# Altium PCB PCB_Smart-Watch-v1.0.PcbDoc (part 2 of 2)
Units mil, origin at the board's own origin, x right, y up, seen from the top; angles counter-clockwise.
Board outline 1007.4 x 787.4 mil, 4 copper layers (Top Layer, Layer 1, Layer 2, Bottom Layer), stack 62.449 mil thick; 64 components, 42 nets, 320 pads, 89 vias.
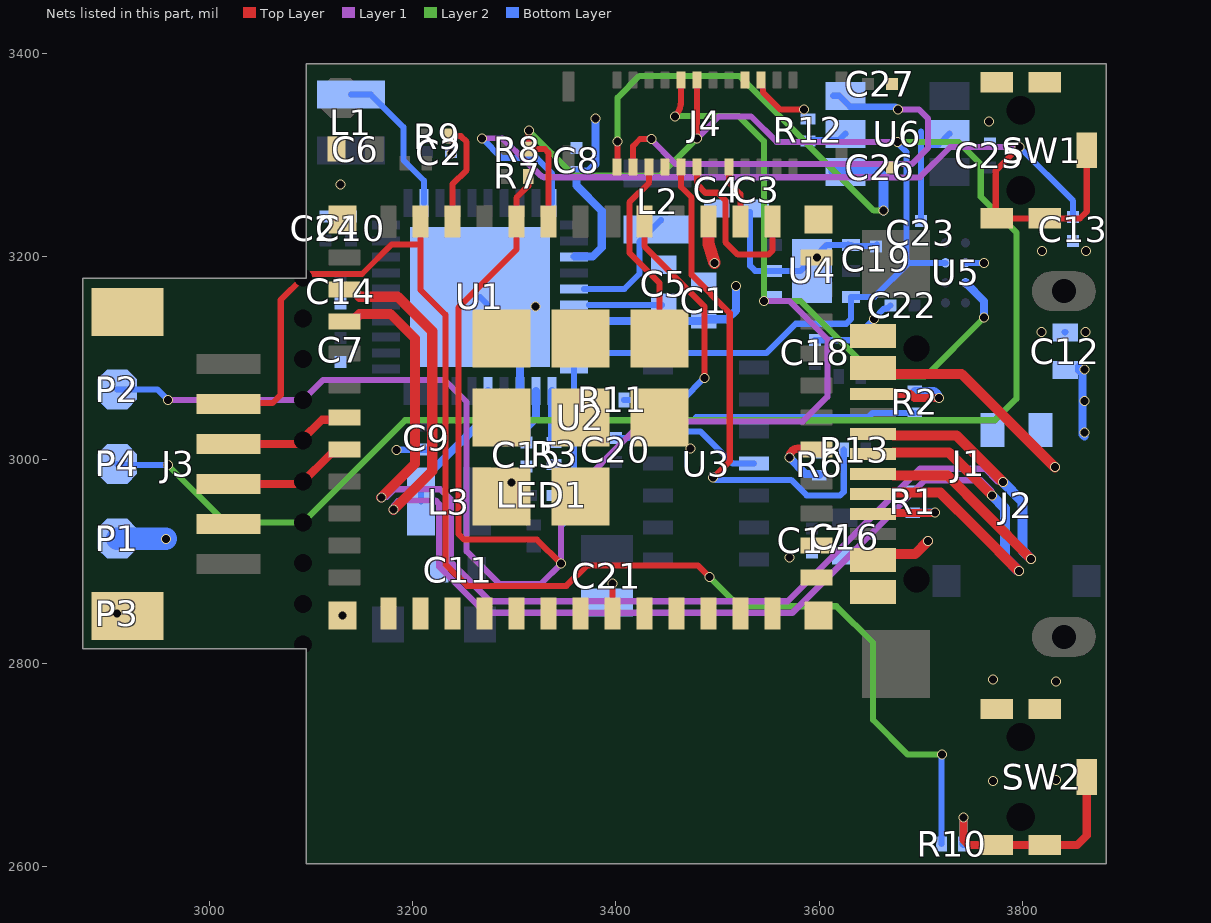
[diagram p4: the nets of this part, all layers, seen from the top]

## Via types
v1: diameter 9.84, hole 7.87, Top Layer to Bottom Layer, tented both sides, 89 vias

## Nets (pads, with @x,y where several pads share a name; then routed paths per layer and width w, separated by ;. In a path a pad name is that pad's centre, name@x,y a point inside that pad or via, vN(x,y) a via of type N, cw(c..) or ccw(c..) an arc to the next point about the centre after c; other vN are vias at no path point) (continued)
GND: C1.1 C2.2 C3.1 C4.1 C5.2 C6.1 C7.1 C8.1 C9.2 C10.1 C11.1 C12.2 C13.2 C14.1 C15.2 C16.1 C17.1 C18.1 C19.2 C20.1 C21.2 C22.2 C23.1 C24.1 C25.1 C26.1 C27.1 J1.A1 J1.A12 J1.B1 J1.B12 J2.2 J3.2 J3.MP1 J3.MP2 J4.3 J4.4 J4.15 J4.16 P3.1 pad.NC@3092,2818.11 R1.1 R2.1 R12.1 SW1.A SW1.G SW2.A SW2.G U1.3 U1.41 U2.1 U2.2 U2.11 U2.14 U2.36 U2.37 U2.38 U2.39 U2.40 U2.41 U2.42 U2.43 U2.44 U2.45 U2.46 U2.47 U2.48 U2.49 U2.50 U2.51 U2.52 U2.53 U3.4 U3.12 U4.2 U4.4 U4.7 U5.B1 U6.2 | length 1276.8
  Top Layer w6: U2.43@3396.47,2849 v1(3396.47,2878.47) ; J4.3@3432.51,3288.17 3432.51,3272.89 3413.09,3253.47 3413.09,3203.91 3419.47,3197.54 3442.74,3174.26 U2.49@3442.74,3119.67 ; J4.15@3542.75,3374 3544.28,3368.73 3544.5,3361.86 3561.38,3344.98 3585.1,3344.98 v1(3585.19,3344.89) ; U2.11@3597.26,3199.39 3597.61,3199.39 v1(3598,3199)
  Top Layer w12: U2.14@3490.96,3226.95 U2.14@3490.96,3234.83 3491,3222.08 3491,3213.92 ccw(c3497,3213.92) 3491.28,3212.12 v1(3497,3194)
  Bottom Layer w6: v1(3184,3010) 3212.81,3010 C9.2@3213,3010.19 ; U1.41@3266.12,3160.48 3305.49,3121.11 U1.41@3305.49,3137.11 ; v1(3297,2978) 3297,2978.38 C15.2@3312,2993.38 ; C20.1@3400,3021.62 3414.62,3021.62 3420.8,3027.8 U3.12@3441.46,3027.8 3483.2,3027.8 3514.7,2996.3 U3.4@3535.94,2996.3 ; 3479,3042 3648.22,3042 3652.57,3046.35 R2.1@3694,3046.35 ; C3.1@3532,3244 3532,3191 3537,3186 3581.69,3186 U4.7@3593,3197.31 ; C18.1@3596,3117.81 3632.94,3117.81 v1(3653.73,3138.6) 3664.23,3149.09 3667.09,3149.09 C22.2@3670,3152 ; U4.7@3596.34,3200.66 3607.28,3211.59 3628.17,3211.59 U4.4@3628.57,3212 ; U4.4@3631.39,3211.59 3632.28,3210.7 3655.7,3210.7 C19.2@3657,3212 ; C23.1@3700.01,3235.31 3700.01,3264.85 3700,3323 ; 3708.08,3310.22 3717.4,3310.22 U6.2@3728.18,3321 ; U5.B1@3744,3194 v1(3762,3194) ; C12.2@3841.5,3126 C12.2@3842,3125.5 C12.2@3842.5,3126
  Bottom Layer w8: U1.3@3305.49,3067.96 U1.41@3305.49,3121.11
  other v1: 3771,2684 3833,2685 3833,2782 3771,2784 3130.72,2847.03 2909,2849 3571,2904 3473.13,3011.42 3819,3126 3862,3126 3321,3151 3819.45,3205.75 3862.45,3205.75 3129,3271 3238,3301.55 3767,3333
HEART_RATE_INT: R11.1 U2.16 U3.13 | length 266.7
  Top Layer w6: U2.16@3427.97,3234.83 3427.97,3210.08 3487,3151.05 v1(3487,3080.79)
  Bottom Layer w6: R11.1@3407.83,3059 3407.97,3059.15 3441.31,3059.15 U3.13@3441.46,3059.29 3465.5,3059.29 v1(3487,3080.79)
I2C.SCL: J4.20 P2.1 pad.3 R7.1 U1.40 U2.20 U4.1 U5.C1 | length 2424.1
  Top Layer w6: R7.1@3313.65,3279 3313.65,3269.65 3301.98,3257.98 U2.20@3301.98,3234.83 3301.98,3206.98 3245.12,3150.12 3245.12,2926.88 3250.38,2921.62 3322.19,2921.62 v1(3346,2897.81) ; v1(3457.83,3338.07) ccw(c3442.93,3352.98) 3464.01,3352.98 J4.20@3464.01,3374 J4.20@3463.74,3373.73
  Layer 1 w6: v1(2959,3059.05) pad.3@3092,3059.05 3111.76,3078.81 3231.19,3078.81 3253,3057 3253,2910 3285,2878 3326.19,2878 v1(3346,2897.81) 3346,2957 3427,3038 3584,3038 3608,3062 3608,3119 3570.55,3156.45 v1(3545.5,3156.45)
  Layer 2 w6: v1@3457.14,3338.38 3520.85,3338.38 3545.5,3313.73 v1(3545.5,3156.45) 3581.55,3156.45 3656,3082 3704.18,3082 v1(3762.19,3140.01)
  Bottom Layer w6: P2.1@2909,3069.5 2948.55,3069.5 v1(2959,3059.05) ; v1(3346,2897.81) 3346,2935 3358.64,2947.64 U1.40@3358.64,3089.61
  Bottom Layer w8: U5.C1@3744.15,3173.97 3744.34,3173.97 3762.19,3156.13 v1(3762.19,3140.01)
I2C.SDA: J4.19 P4.1 pad.NC@3092,2938.58 R8.1 U1.39 U2.19 U4.6 U5.B2 | length 2413.5
  Top Layer w6: v1(3314.13,3324.19) 3313.89,3323.95 3313.89,3306.24 R8.1@3313.65,3306 3329.97,3306 3333.48,3302.49 U2.19@3333.48,3234.83 ; v1@3479.76,3317.68 J4.19@3479.76,3374
  Layer 1 w6: v1(3479.87,3316.57) 3501.3,3338 3533,3338 3558,3313 v1(3677,3313)
  Layer 2 w6: v1(2959,2995) 3015.42,2938.58 pad.NC@3092,2938.58 3192.42,3039 3773,3039 3794,3060 3794,3224 3759,3259 3759,3291 3737,3313 v1(3677,3313) ; v1(3314.13,3324.19) 3358.32,3280 3443.3,3280 v1(3479.87,3316.57)
  Bottom Layer w6: P4.1@2909,2996 2910,2995 v1(2959,2995) ; U1.39@3358.64,3105.36 3548.26,3105.36 3576.9,3134 3626.62,3134 3631.39,3138.77 U4.6@3631.39,3160.41 3654.41,3160.41 3688,3194 ; v1(3677,3313) 3677,3311.96 3686,3302.96 3686,3196 3688,3194 ; U5.B2@3724.32,3194 3688,3194
IO9: J3.5 pad.NC@3092,3179.53 R10.1 U2.23 | length 1383
  Top Layer w6: J3.5@3007,3056 3062,3056 3070,3064 3070,3157.53 pad.NC@3092,3179.53 3095.47,3183 3150,3183 3179.08,3212.08 3186.77,3212.08 ; 3187.19,3212.08 3207.5,3212.08 ; U2.23@3207.5,3234.83 3207.5,3212.5 3207.5,3167.5 3232.12,3142.88 3232.12,2897.33 3253.44,2876 3351,2876 3371,2896 3480.81,2896 v1(3492,2884.81)
  Layer 2 w6: v1(3492,2884.81) 3520.81,2856 3617,2856 3653,2820 3653,2744 3687,2710 v1(3721,2710)
  Bottom Layer w6: R10.1@3720.35,2622 3720.35,2709.35 v1(3721,2710)
LEDK-1: J4.1 U6.4 | length 478.6
  Top Layer w6: J4.1@3401.02,3288.17 3401.51,3288.67 v1(3401.51,3313.51)
  Layer 2 w6: v1(3401.51,3313.51) 3401.51,3356.51 3423,3378 3521.23,3378 3653.87,3245.36 v1(3663.39,3245.36)
  Bottom Layer w10: U6.4@3614.22,3284 3657.54,3284 3663.39,3278.14 v1(3663.39,3245.36)
LEDK-2: J4.2 U6.6 | length 464.5
  Top Layer w6: J4.2@3416.76,3288.17 3416.76,3308.98 3423.63,3315.84 v1(3435.16,3315.84)
  Layer 1 w6: v1@3433.16,3316.84 3458.83,3291.17 3691.17,3291.17 3706.94,3306.94 3706.94,3336.06 3698,3345 v1(3677.68,3345)
  Bottom Layer w6: U6.6@3613.82,3358.4 3619.72,3358.4 3630.5,3347.62 3675.06,3347.62 v1(3677.68,3345)
NetC5_1: C5.1 U1.36 | length 71.4
  Bottom Layer w6: 3373.64,3152.61 C5.1@3445,3152.61
NetC13_1: C13.1 SW1.B U1.30 | length 988.7
  Top Layer w6: v1(3797,3308) 3773.79,3284.79 3773.79,3238.67 SW1.B@3774.76,3237.7 SW1.B@3822,3237.7 3856.7,3237.7 3863.34,3244.34 SW1.B@3863.34,3304.63
  Layer 1 w6: v1(3268.14,3316.42) 3287.62,3316.78 3291.95,3312.62 3325.96,3279.85 ccw(c3330.12,3284.17) 3330.12,3278.17 3667.98,3278.17 3668.15,3278 3699,3278 3729,3308 v1@3795,3308
  Bottom Layer w6: v1(3268.14,3316.42) 3287.56,3297 3322,3297 3336.98,3282.02 U1.30@3336.98,3253 ; v1(3797,3308) 3850,3255 C13.1@3850,3240
NetC15_1: C15.1 U1.2 | length 54.8
  Bottom Layer w8: C15.1@3312,3017 3312,3032 3321.24,3041.24 U1.2@3321.24,3067.96
NetJ1_A5: J1.A5 R1.2 | length 75.1
  Top Layer w8: J1.A5@3653.2,2946.79 3654.06,2947.65 3713.55,2947.65 v1(3713.9,2948)
  Bottom Layer w8: 3700,2948 v1(3713.9,2948)
NetJ1_B5: J1.B5 R2.2 | length 96
  Top Layer w8: J1.B5@3653.2,3064.9 3689.93,3064.9 3693.93,3060.9 3717.62,3060.9 v1(3717.74,3060.77)
  Bottom Layer w8: R2.2@3695.32,3066.68 R2.2@3694,3068 3710.51,3068 cw(c3710.51,3060.77) v1(3717.74,3060.77)
NetL1_1: L1.1 U1.22 | length 147.9
  Bottom Layer w6: L1.1@3139,3359.56 3158.68,3359.56 3169.46,3348.78 3190.81,3327.43 3190.81,3295.19 3211,3275 U1.22@3211,3253
NetL2_2: L2.2 U1.35 | length 122.1
  Bottom Layer w6: U1.35@3368.64,3168.35 3408.35,3168.35 3423,3183 3423,3214.68 L2.2@3444.22,3235.91
NetL3_1: L3.1 U1.5 | length 136.6
  Bottom Layer w6: L3.1@3207.88,2959 3207.88,2978.68 3218.66,2989.46 L3.1@3219.13,2989.46
  Bottom Layer w8: L3.1@3219.13,2989.46 3273.99,3044.33 U1.5@3273.99,3067.96
NetLED1_2: LED1.2 R3.1
NetR3_2: R3.2 U1.1 | length 51
  Bottom Layer w8: R3.2@3336.98,3017 U1.1@3336.98,3067.96
NetR6_2: R6.2 U2.5 | length 74.3
  Top Layer w8: v1(3570.7,3002.19) 3570.7,3002.7 cw(c3579,3002.7) 3579,3011 3597.26,3011 U2.5@3597.26,3010.42 U2.5@3593.39,3006.54
  Bottom Layer w8: v1(3570.7,3002.19) 3586.57,2986.32 3598.68,2986.32 R6.2@3600,2985
NetR9_2: R9.2 U2.22 | length 109.7
  Top Layer w6: R9.2@3237.22,3314.47 3234.9,3316.78 R9.2@3234.9,3318.75 3247.25,3318.75 3253,3313 3253,3285.28 3239,3271.27 U2.22@3238.99,3234.83
NetR10_2: R10.2 SW2.B | length 233.1
  Top Layer w8: v1(3742.16,2648) 3742.07,2647.91 3742.07,2625.69 3746.76,2621 SW2.B@3822,2621 3854,2621 3863.34,2630.34 SW2.B@3863.34,2687.93
  Bottom Layer w8: R10.2@3742,2622 3742.08,2622.08 3742.08,2647.92 v1(3742.16,2648)
NetR12_2: R12.2 U6.5 | length 37.3
  Bottom Layer w6: R12.2@3591,3315 3619.82,3315 U6.5@3625.82,3321
RS: J4.5 R6.1 R13.1 | length 511.6
  Top Layer w6: J4.5@3464.01,3288.17 3464.01,3268.61 3474.34,3258.28 3474.34,3182.09 3512,3144.43 3512,2998.81 3496.08,2982.89 v1(3495.38,2982.89)
  Bottom Layer w6: v1(3495.38,2982.89) 3497.9,2980.38 3572.28,2980.38 3587.66,2965 3620.66,2965 3624.17,2968.51 R13.1@3624.17,3010
RXD: J3.4 pad.NC@3092,3018.9 U2.30 | length 125.5
  Top Layer w8: J3.4@3018.7,3015.69 3088.79,3015.69 pad.NC@3092,3018.9 ; 3090.95,3019.95 3110.51,3039.51 3130.29,3039.51 U2.30@3132.69,3041.91
SCL_L: J4.8 U2.13 | length 58
  Top Layer w6: J4.8@3511.25,3288.17 3511.25,3272.75 3522.46,3261.54 U2.13@3522.46,3234.83
SDI: J4.6 U2.12 | length 174.3
  Top Layer w6: J4.6@3479.76,3288.17 3479.76,3271.24 3488,3263 3500,3263 3507.58,3255.42 3507.58,3214.42 3520,3202 3550,3202 3553.95,3205.95 U2.12@3553.95,3234.83
TXD: J3.3 pad.NC@3092,2978.74 U2.31 | length 128.1
  Top Layer w8: J3.3@3018.7,2976.32 3089.58,2976.32 3119.8,3006.54 3128.82,3006.54 U2.31@3132.69,3010.42
USB_N: J1.A7 J1.B7 U2.26 | length 1429.9
  Top Layer w10: U2.26@3132.69,3167.9 3140.57,3167.9 3147.82,3160.65 3185.04,3160.65 3219.12,3126.57 3219.12,2989.07 v1(3181.02,2950.98) ; J1.B7@3653.2,2966.47 3654.1,2967.38 3672.64,2967.38 3673.08,2967.81 3719.19,2967.81 3755.96,2931.04 v1(3796.5,2890.5) ; J1.A7@3653.2,3005.84 3654.1,3006.75 3672.64,3006.75 3673.08,3007.18 3727.9,3007.18 v1(3770.04,2965.04)
  Layer 1 w6.27: v1(3181.02,2950.98) 3181.7,2951.66 3181.7,2955.22 3186.48,2960 3222.33,2960 3226,2956.33 3226,2895 3271.27,2849.73 3573.67,2849.73 3703.94,2980 3758.74,2980 3769.36,2969.38 3769.36,2965.73 v1(3770.04,2965.04)
  Bottom Layer w10: v1(3770.04,2965.04) 3783,2952.08 3783,2933.62 3783,2904 v1(3796.5,2890.5)
USB_P: J1.A6 J1.B6 U2.27 | length 1433
  Top Layer w10: U2.27@3132.69,3136.4 3140.57,3136.4 3147.82,3143.65 3178,3143.65 3202.12,3119.53 3202.12,2996.12 v1(3169,2963) ; J1.A6@3653.2,2986.16 3654.1,2985.25 3672.64,2985.25 3673.08,2984.81 3726.23,2984.81 3763,2948.04 v1(3808.52,2902.52) ; J1.B6@3653.2,3025.53 3654.1,3024.62 3672.64,3024.62 3673.08,3024.18 3734.94,3024.18 v1(3780.66,2978.46)
  Layer 1 w6.27: v1(3169,2963) 3169.68,2963.68 3174.23,2963.68 3181.81,2971.27 3227,2971.27 3237.27,2961 3237.27,2899.67 3275.94,2861 3569,2861 3699.27,2991.27 3763.41,2991.27 3775.53,2979.14 3779.98,2979.14 v1(3780.66,2978.46)
  Bottom Layer w10: v1(3780.66,2978.46) 3800,2959.12 3800,2926.58 3800,2911.04 v1(3808.52,2902.52)
VBAT: C8.2 C12.1 J2.1 P1.1 pad.NC@3092,2858.27 U1.33 | length 301.4
  Bottom Layer w8: P1.1@2909,2922.5 P1.1@2909.25,2922.25 ; v1@2956.75,2922.25 v1(2957,2922) ; U1.33@3359.3,3200.18 3377.08,3200.18 3386,3209.11 3386,3245 3361,3270 C8.2@3361,3283.19 3361.8,3283.99 3372.99,3283.99 3380,3291 v1(3380,3336) ; 3856,3092 3856,3088 3859,3085 3859,3025 v1@3861,3023
  Bottom Layer w22: P1.1@2909.25,2922.25 v1@2956.75,2922.25
  other v1: 3861,3027 3861,3058 3861,3089
VBUS: C1.2 J1.A4 J1.A9 J1.B4 J1.B9 U1.37 | length 456.7
  Top Layer w10: J1.B9@3653.2,2907.42 3694.42,2907.42 v1(3707,2920) ; J1.B4@3653.2,3084.58 3740.21,3084.58 v1(3832,2992.79)
  Bottom Layer w8: U1.37@3363.64,3136.86 C1.2@3485.5,3136.86 ; C1.2@3486.5,3138.5 3509.5,3138.5 3518,3147 v1(3518,3171)
pads on no net: J1. J1.25 J1.26 J1.27 J1.28 J1.A8 J1.B8 J2.S1 J2.S2 J4.7 J4.22 J4.S1 J4.S2 J4.S3 J4.S4 SW1.6 SW1.7 SW2.6 SW2.7 U1.8 U1.9 U1.10 U1.11 U1.12 U1.14 U1.15 U1.16 U1.19 U1.25 U1.26 U1.27 U1.28 U1.29 U1.31 U1.32 U2.4 U2.7 U2.9 U2.10 U2.15 U2.17 U2.24 U2.25 U2.28 U2.29 U2.32 U2.33 U2.34 U2.35 U3.1 U3.5 U3.6 U3.7 U3.8 U3.14 U4.3

## Polygon pours and split planes (outlines as drawn)
GND on Top Layer "GND_L01_P000" (solid, remove dead copper, pour order 0): 2875,2814 2875,3178.6 3095,3178.6 3095,3390 3882.4,3390 3882.4,2602.6 3095,2602.6 3095,2814
3V3 on Top Layer "3V3_L01_P006" (solid, remove dead copper, pour order 6): 3103,3382 3103,3324 3151,3324 3151,3265 3409,3265 3409,3382
VBAT on Layer 1 "VBAT_L02_P007" (solid, remove dead copper, pour order 7): 3104,3386 3104,3177.6 2874,3177.6 2874,2813 3104,2813 3104,3153 3775,3153 3775,3013 3877,3013 3877,3384.01
GND on Layer 1 "GND_L02_P012" (solid, remove dead copper, pour order 12): 2875,2814 2875,3178.6 3095,3178.6 3095,3390 3882.4,3390 3882.4,2602.6 3095,2602.6 3095,2814
AXP_PS on Layer 1 "AXP_PS_L02_P009" (solid, pour order 9): 3141.84,3042 3191.04,3042 3191.04,3035.04 3191.04,2990 3142,2990 3142,2833 3629,2833 3629,2726 3717,2726 3717,2837 3716,2868 3239,2868 3223,2884 3223,3075 3142,3075 3141,3074
VBUS on Layer 1 "VBUS_L02_P003" (solid, remove dead copper, pour order 3): 3762,2889 3840,2889 3840,3012 3762,3012 3762,3175 3740,3197 3505,3197 3505,3156.45 3642.55,3156.45 3682,3117 3682,2889
GND on Layer 2 "GND_L03_P011" (solid, remove dead copper, pour order 11): 2875,2814 2875,3178.6 3095,3178.6 3095,3390 3882.4,3390 3882.4,2602.6 3095,2602.6 3095,2814
1V8 on Layer 2 "1V8_L03_P002" (solid, remove dead copper, pour order 2): 3711,3133 3122,3133 3122,3150 3062,3150 3062,3024 3630,3024 3630,2806 3879,2806 3879,3249 3711,3249
AXP_PS on Layer 2 "AXP_PS_L03_P010" (solid, pour order 10): 3223,3138.41 3223,3178.6 3438,3178.6 3438,3190 3416,3212 3228,3212 3228,3362 3130,3362 3130,3138.41
GND on Bottom Layer "GND_L04_P001" (solid, remove dead copper, pour order 1): 2874.99,2813.58 2874.99,3178.18 3094.99,3178.18 3094.99,3389.58 3882.39,3389.58 3882.39,2602.18 3094.99,2602.18 3094.99,2813.58

## Other copper
Top Layer:
  region net IO9: 3095,3189.53 3095,3169.53 3103.1,3169.53 3103.1,3189.53
  region net IO9: 3103.1,3178.53 3083,3178.53 3083,3167.42 3103.1,3167.42
  region net GND: 3095,2828.11 3095,2808.11 3103.1,2808.11 3103.1,2828.11
  rectangle net GND: 3082,2814 3102,2829.21
  rectangle net VBAT: 3082,2844.37 3102,2869.37
  rectangle net 3V3: 3082,2884.53 3102,2909.53
  rectangle net I2C.SDA: 3082,2924.69 3102,2949.69
  rectangle net TXD: 3082,2964.84 3102,2989.84
  rectangle net 1V8: 3082,3125.47 3102,3150.47
  rectangle net CTP_RST: 3082,3085.32 3102,3110.32
  rectangle net I2C.SCL: 3082,3045.16 3102,3070.16
  rectangle net IO9: 3193,3209.08 3217,3251
  rectangle net 3V3: 3152.24,3271 3198,3304
  rectangle net GND: 3635,3111 3667,3152
  rectangle net 3V3: 3596,3280.17 3608,3383
  rectangle net 3V3: 3367,3359 3394,3383
  rectangle net GND: 3114,3222 3144,3319
  region net 3V3: 3420.76,3383 3367,3383 3367,3366 3420.76,3366
  rectangle net GND: 3432.51,3280.53 3452,3296
  rectangle net 3V3: 3604,3323 3656,3340
  region net 3V3: 3656.19,3280.17 3656.19,3383 3636,3383 3636,3280.17
  rectangle net 3V3: 3554.5,3280.17 3606,3297.17
  rectangle net 3V3: 3554.5,3366 3608,3383
  rectangle net GND: 3523,3366 3547,3382
  rectangle net 3V3: 3558,2935 3613,2963
  region net VBUS: 3675,3103 3633.39,3103 3633.39,3084.58 3675,3084.58
  rectangle net RXD: 3082,3005 3102,3030
  rectangle net CTP_RST: 3555,3088 3613,3119
  pour cut-out: 3095,2826 3095,2602.6 3620.59,2602.6 3620.59,2826
Layer 1:
  pour cut-out: 3095,2826 3095,2602 3620.59,2602 3620.59,2826
Layer 2:
  pour cut-out: 3095,2826 3095,2602 3620.59,2602 3620.59,2826
Bottom Layer:
  rectangle net AXP_PS: 3122,3171 3150,3187
  rectangle net AXP_PS: 3122,3112 3150,3128
  rectangle net 1V8: 3108,3196 3121,3222
  rectangle net 3V3: 3170,3244 3199,3267
  rectangle net VBAT: 3798,3013 3875,3060
  rectangle net CTP_RST: 3562,3085.63 3625,3104
  rectangle net GND: 3811,3114 3875,3141
  rectangle net 1V8: 3037,3123.24 3103,3150.37
  rectangle net 1V8: 2885.2,3123.24 3047,3171
  rectangle net GND: 3579,3329 3598,3352
  rectangle net GND: 3365,2857 3417,2887
  rectangle net 1V8: 3694.01,3205.68 3725,3221
  rectangle net 1V8: 3715.16,3205.68 3734,3242
  rectangle net 3V3: 3749,3282 3776,3298
  rectangle net GND: 3697,3305 3777,3337
  rectangle net 3V3: 3710,3268 3754.03,3298
  rectangle net GND: 3108,3235 3144,3277
  rectangle net GND: 3465,3002 3514,3045
  rectangle net LEDK-2: 3657,3333 3687,3373
  rectangle net NetL2_2: 3413,3213 3476,3241
  rectangle net 3V3: 3104,3290 3177,3322
  rectangle net AXP_PS: 3224,3239 3246,3266.99
  rectangle net GND: 3697,3305 3753.03,3335
  rectangle net AXP_INT: 3303,2887 3327,2922
  rectangle net 3V3: 3155,3244 3177,3322
  rectangle net I2C.SCL: 3537,3146 3564,3172
  rectangle net AXP_PS: 3433,3274 3551,3294
  rectangle net LEDK-2: 3607,3344 3687,3373
  rectangle net NetR6_2: 3594.03,2980 3613,2993
  rectangle net 3V3: 3640,2925 3652,3018
  rectangle net AXP_PS: 3238,3054 3263,3082
  rectangle net VBAT: 3812,3013 3875,3100
  rectangle net NetLED1_2: 3331,2956 3346,3002
  rectangle net AXP_3V3: 3248,2820 3277,2992
  rectangle net CTP_RST: 3562,3070 3625,3090
  rectangle net RS: 3592,3000 3633,3018
  rectangle net 3V3: 3558,2925 3652,2953
  pour cut-out: 3643,3234 3643,3148 3643,3147 3537,3147 3537,3234
  pour cut-out: 3095,2826 3095,2602 3620.59,2602 3620.59,2826
  region net 3V3: 3487,2943 3487,2920 3429,2920 3418,2920 3418,2898 3371,2898 3366,2898 3366,2930 3374,2938 3374,2977 3451,2977 3487,2943 3457,2943

## Silkscreen, mask and mechanical layers (free items; w line width, h text height)
Top Overlay:
  lines w5: 3174.5,3322 3185,3322 3215,3352 ; 3228,3291 3245,3291 ; 3240.08,3328.75 3262.33,3351 3281,3351
  lines w10: 3564.5,2879.5 3564.5,2893.5 3572,2886 3565,2879
  text "3V" at 3154.72,3341.72 h35
  text "*" at 3707,3339.29 h60
  text "@" at 3319.83,3293 h22
  text "@" at 3321.83,3267 h22
  text "*" at 3707,3259.29 h60
Bottom Overlay:
  lines w5: 3112,2800 3112,3137 ; 3129,2987 3129,3087.19 ; 3351,2805 3351,2898 ; 3626.34,2877 3626.34,2889.19 ; 3631,2998.09 3631,2985.63 3631,2967 3643,2967 ; 3649,3086 3715,3086 3723,3094 ; 3742,3371 3809,3371 3820,3360 ; 3098,3138 3158,3138 3158,3261.48 3098,3261.48 3098,3138 ; 3105,2610 3105,2796 3187,2796 3187,2610 3105,2610 ; 3281,2610 3281,2805 3401,2805 3401,2610 3281,2610 ; 3295,2898 3295,3033 3362,3033 3362,2898 3295,2898
  text "*" at 3759,3235.29 h60
  text "*" at 3840,3232.29 h60
  text "*" at 3713,3212.29 h60
  text "*" at 3646,3202.29 h60
  text "*" at 3686,3145.29 h60
  text "1V8" at 3078,3123.24 h55
  text "@" at 3418,3071 h22
  text "SCL" at 3077,3049.73 h55
  text "+VE" at 3873.78,3036.76 h22
  text "-VE" at 3750.46,3033.76 h22
  text "SDA" at 3076,2974.73 h55
  text "*" at 3390.39,2943.86 h60
  text "*" at 3583,2925.1 h60
  text "VBAT" at 3074,2906 h55
  text "GND" at 3076,2826.5 h55
  text "Note:" at 3758,2750 h50
  text "*" at 3112,2743.29 h60
  text "* 0.1uF << 0201" at 3758,2709 h50
  text "@ 4.7K<< 0201" at 3758,2659 h50
Dimension:
  lines w10: 3094,2996.3 3882.4,2996.3 ; 3488.7,2602.6 3488.7,3390
Fabrication:
  drawing of 295 lines, arcs and shapes, not listed
  text "Layer" at 4219.34,3773 h60
  text "Name" at 4629.26,3773 h60
  text "Material" at 5559,3773 h60
  text "Thickness" at 6418.77,3773 h60
  text "Constant" at 7068.6,3773 h60
  text "Board Layer Stack" at 7638.46,3773 h60
  text "Top Overlay" at 4629.26,3653 h60
  text "Top Solder" at 4629.26,3533 h60
  text "Solder Resist" at 5559,3533 h60
  text "0.39mil" at 6418.77,3533 h60
  text "3.5" at 7068.6,3533 h60
  text "1" at 4219.34,3413 h60
  text "Top Layer" at 4629.26,3413 h60
  text "1.38mil" at 6418.77,3413 h60
  text "Dielectric 2" at 4629.26,3293 h60
  text "PP-006" at 5559,3293 h60
  text "8.28mil" at 6418.77,3293 h60
  text "4.1" at 7068.6,3293 h60
  text "2" at 4219.34,3173 h60
  text "Layer 1" at 4629.26,3173 h60
  text "CF-004" at 5559,3173 h60
  text "0.60mil" at 6418.77,3173 h60
  text "Dielectric 1" at 4629.26,3053 h60
  text "FR-4" at 5559,3053 h60
  text "41.93mil" at 6418.77,3053 h60
  text "4.8" at 7068.6,3053 h60
  text "3" at 4219.34,2933 h60
  text "Layer 2" at 4629.26,2933 h60
  text "CF-004" at 5559,2933 h60
  text "0.60mil" at 6418.77,2933 h60
  text "Dielectric 3" at 4629.26,2813 h60
  text "PP-006" at 5559,2813 h60
  text "8.28mil" at 6418.77,2813 h60
  text "4.1" at 7068.6,2813 h60
  text "4" at 4219.34,2693 h60
  text "Bottom Layer" at 4629.26,2693 h60
  text "1.38mil" at 6418.77,2693 h60
  text "Bottom Solder" at 4629.26,2573 h60
  text "Solder Resist" at 5559,2573 h60
  text "0.39mil" at 6418.77,2573 h60
  text "3.5" at 7068.6,2573 h60
  text "Bottom Overlay" at 4629.26,2453 h60
Board_Outline:
  the board outline again, w10
Drill Drawing:
  circle w10: c2656.62,4747.27 r33.33
  lines w10: 2623.29,4413.94 2623.29,4430.61 2639.96,4447.27 2623.29,4463.94 2623.29,4480.61 2639.96,4480.61 2656.62,4463.94 2673.29,4480.61 2689.96,4480.61 2689.96,4463.94 2673.29,4447.27 2689.96,4430.61 2689.96,4413.94 2673.29,4413.94 2656.62,4430.61 2639.96,4413.94 2623.29,4413.94 ; 2623.29,4580.61 2639.96,4580.61 2639.96,4563.94 2673.29,4563.94 2673.29,4580.61 2689.96,4580.61 2689.96,4613.94 2673.29,4613.94 2673.29,4630.61 2639.96,4630.61 2639.96,4613.94 2623.29,4613.94 2623.29,4580.61 ; 2623.29,4863.94 2689.96,4863.94 2689.96,4930.61 2623.29,4930.61 2623.29,4863.94 ; 2623.29,5013.94 2656.62,5030.61 2689.96,5013.94 2673.29,5047.27 2689.96,5080.61 2656.62,5063.94 2623.29,5080.61 2639.96,5047.27 2623.29,5013.94
  lines w15: 2563.5,4368.94 17521.22,4368.94 ; 2563.5,5118.94 17521.22,5118.94 ; 3114.38,4218.94 3114.38,5268.94 ; 3704.22,4218.94 3704.22,5268.94 ; 4803.9,4218.94 4803.9,5268.94 ; 5309.78,4218.94 5309.78,5268.94 ; 6043.58,4218.94 6043.58,5268.94 ; 7543.13,4218.94 7543.13,5268.94 ; 8132.98,4218.94 8132.98,5268.94 ; 8878.78,4218.94 8878.78,5268.94 ; 11507.96,4218.94 11507.96,5268.94 ; 12361.72,4218.94 12361.72,5268.94 ; 13695.33,4218.94 13695.33,5268.94 ; 15028.94,4218.94 15028.94,5268.94 ; 16118.62,4218.94 16118.62,5268.94 ; 2563.5,4218.94 17521.22,4218.94 17521.22,5268.94 2563.5,5268.94 2563.5,4218.94
  text "Symbol" at 2653.5,5163.94 h72
  text "Count" at 3159.38,5163.94 h72
  text "Hole Size" at 3749.22,5163.94 h72
  text "Plated" at 4848.9,5163.94 h72
  text "Hole Type" at 5354.78,5163.94 h72
  text "Drill Layer Pair" at 6088.58,5163.94 h72
  text "Via/Pad" at 7588.13,5163.94 h72
  text "Pad Shape" at 8177.98,5163.94 h72
  text "Template" at 8923.78,5163.94 h72
  text "Description" at 11552.96,5163.94 h72
  text "Hole Tolerance (+)" at 12406.72,5163.94 h72
  text "Hole Tolerance (-)" at 13740.33,5163.94 h72
  text "Hole Length" at 15073.94,5163.94 h72
  text "Routed Path Length" at 16163.62,5163.94 h72
  text "2" at 3159.38,5013.94 h60
  text "23.62mil (0.600mm)" at 3749.22,5013.94 h60
  text "PTH" at 4848.9,5013.94 h60
  text "Slot" at 5354.78,5013.94 h60
  text "Top Layer - Bottom Layer" at 6088.58,5013.94 h60
  text "Pad" at 7588.13,5013.94 h60
  text "Rounded" at 8177.98,5013.94 h60
  text "r100_160h60_120r100m105_165mx105_165p100_160" at 8923.78,5013.94 h60
  text "47.24mil (1.200mm)" at 15073.94,5013.94 h60
  text "23.62mil (0.600mm)" at 16163.62,5013.94 h60
  text "2" at 3159.38,4863.94 h60
  text "25.59mil (0.650mm)" at 3749.22,4863.94 h60
  text "NPTH" at 4848.9,4863.94 h60
  text "Round" at 5354.78,4863.94 h60
  text "Top Layer - Bottom Layer" at 6088.58,4863.94 h60
  text "Pad" at 7588.13,4863.94 h60
  text "Rounded" at 8177.98,4863.94 h60
  text "c0hn65p-1" at 8923.78,4863.94 h60
  text "-" at 15073.94,4863.94 h60
  text "-" at 16163.62,4863.94 h60
  text "4" at 3159.38,4713.94 h60
  text "28.00mil (0.711mm)" at 3749.22,4713.94 h60
  text "NPTH" at 4848.9,4713.94 h60
  text "Round" at 5354.78,4713.94 h60
  text "Top Layer - Bottom Layer" at 6088.58,4713.94 h60
  text "Pad" at 7588.13,4713.94 h60
  text "Rounded" at 8177.98,4713.94 h60
  text "c0hn71" at 8923.78,4713.94 h60
  text "-" at 15073.94,4713.94 h60
  text "-" at 16163.62,4713.94 h60
  text "10" at 3159.38,4563.94 h60
  text "17.72mil (0.450mm)" at 3749.22,4563.94 h60
  text "PTH" at 4848.9,4563.94 h60
  text "Round" at 5354.78,4563.94 h60
  text "Top Layer - Bottom Layer" at 6088.58,4563.94 h60
  text "Pad" at 7588.13,4563.94 h60
  text "Rounded" at 8177.98,4563.94 h60
  text "c0h45m45" at 8923.78,4563.94 h60
  text "-" at 15073.94,4563.94 h60
  text "-" at 16163.62,4563.94 h60
  text "89" at 3159.38,4413.94 h60
  text "7.87mil (0.200mm)" at 3749.22,4413.94 h60
  text "PTH" at 4848.9,4413.94 h60
  text "Round" at 5354.78,4413.94 h60
  text "Top Layer - Bottom Layer" at 6088.58,4413.94 h60
  text "Via" at 7588.13,4413.94 h60
  text "Rounded" at 8177.98,4413.94 h60
  text "(Mixed)" at 8923.78,4413.94 h60
  text "-" at 15073.94,4413.94 h60
  text "-" at 16163.62,4413.94 h60
  text "107 Total" at 3159.38,4263.94 h60
  text "Slot definitions :" at 2653.5,4118.97 h60
  text "Routed Path Length" at 3686.19,4118.97 h60
  text "= Calculated from tool start centre position to tool end centre position." at 4788.86,4118.97 h60
  text "Hole Length" at 3686.19,4018.99 h60
  text "= Routed Path Length + Tool Size = Slot length as defined in the PCB layout" at 4378.99,4018.99 h60

## Dimensions
2875,2814 to 3095,2602.6 on Dimension
3095,3390 to 2875,3178.6 on Dimension
3882.4,3390 to 3882.4,2602.6 on Dimension
3095,3390 to 3882.4,3390 on Dimension

## Text inside footprints (layer, text, board x,y; h text height)
C21: Bottom Overlay "+" at 3406,2953.08 h30 r90
J4: Top Overlay "24" at 3369.97,3355.27 h10; Top Overlay "1" at 3381.63,3298.09 h10